# Altium PCB PCB.PcbDoc
Units mm, origin at the board's own origin, x right, y up, seen from the top; angles counter-clockwise.
Board outline 46.43 x 35.58 mm, 2 copper layers (Top Layer, Bottom Layer); 39 components, 27 nets, 193 pads, 33 vias.
Unrouted connection lines stored in the file: 76.
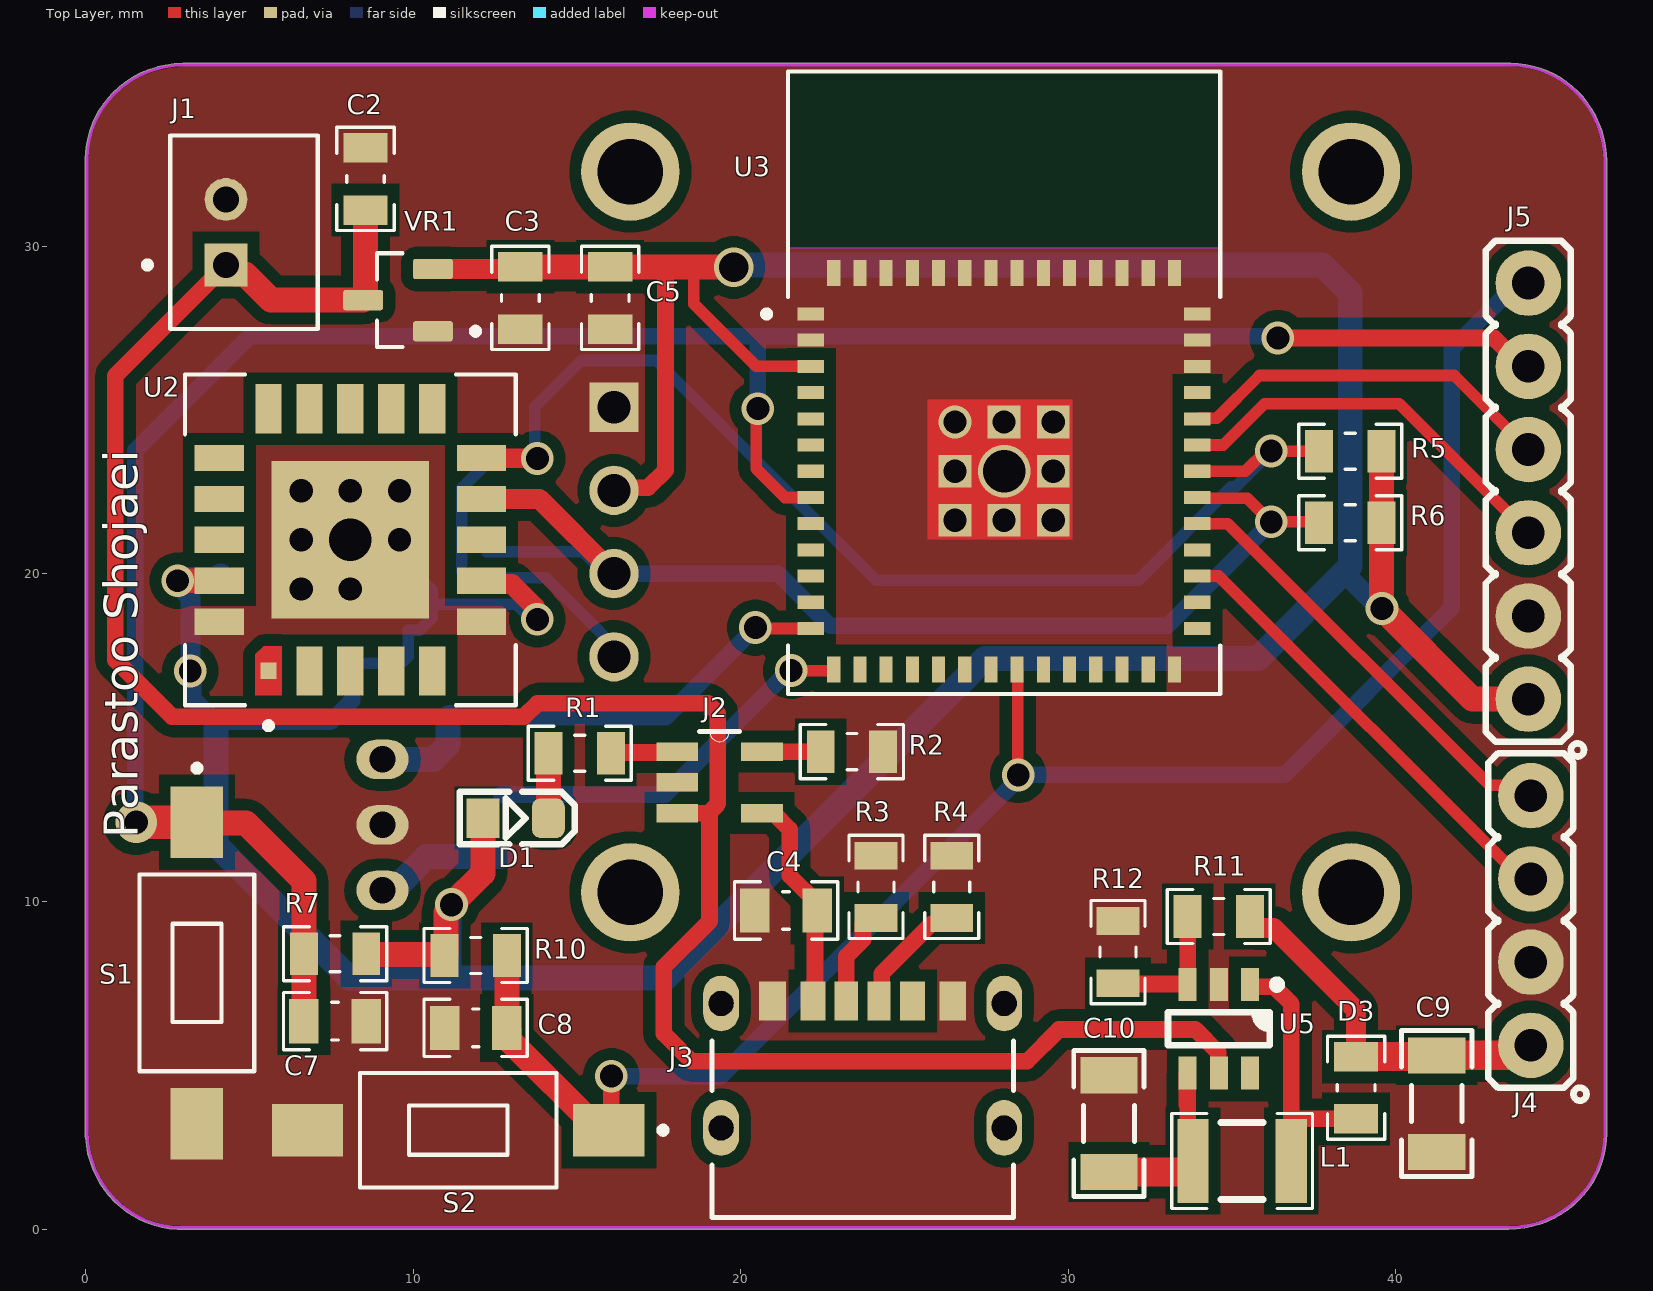
[diagram p0: Top Layer view]
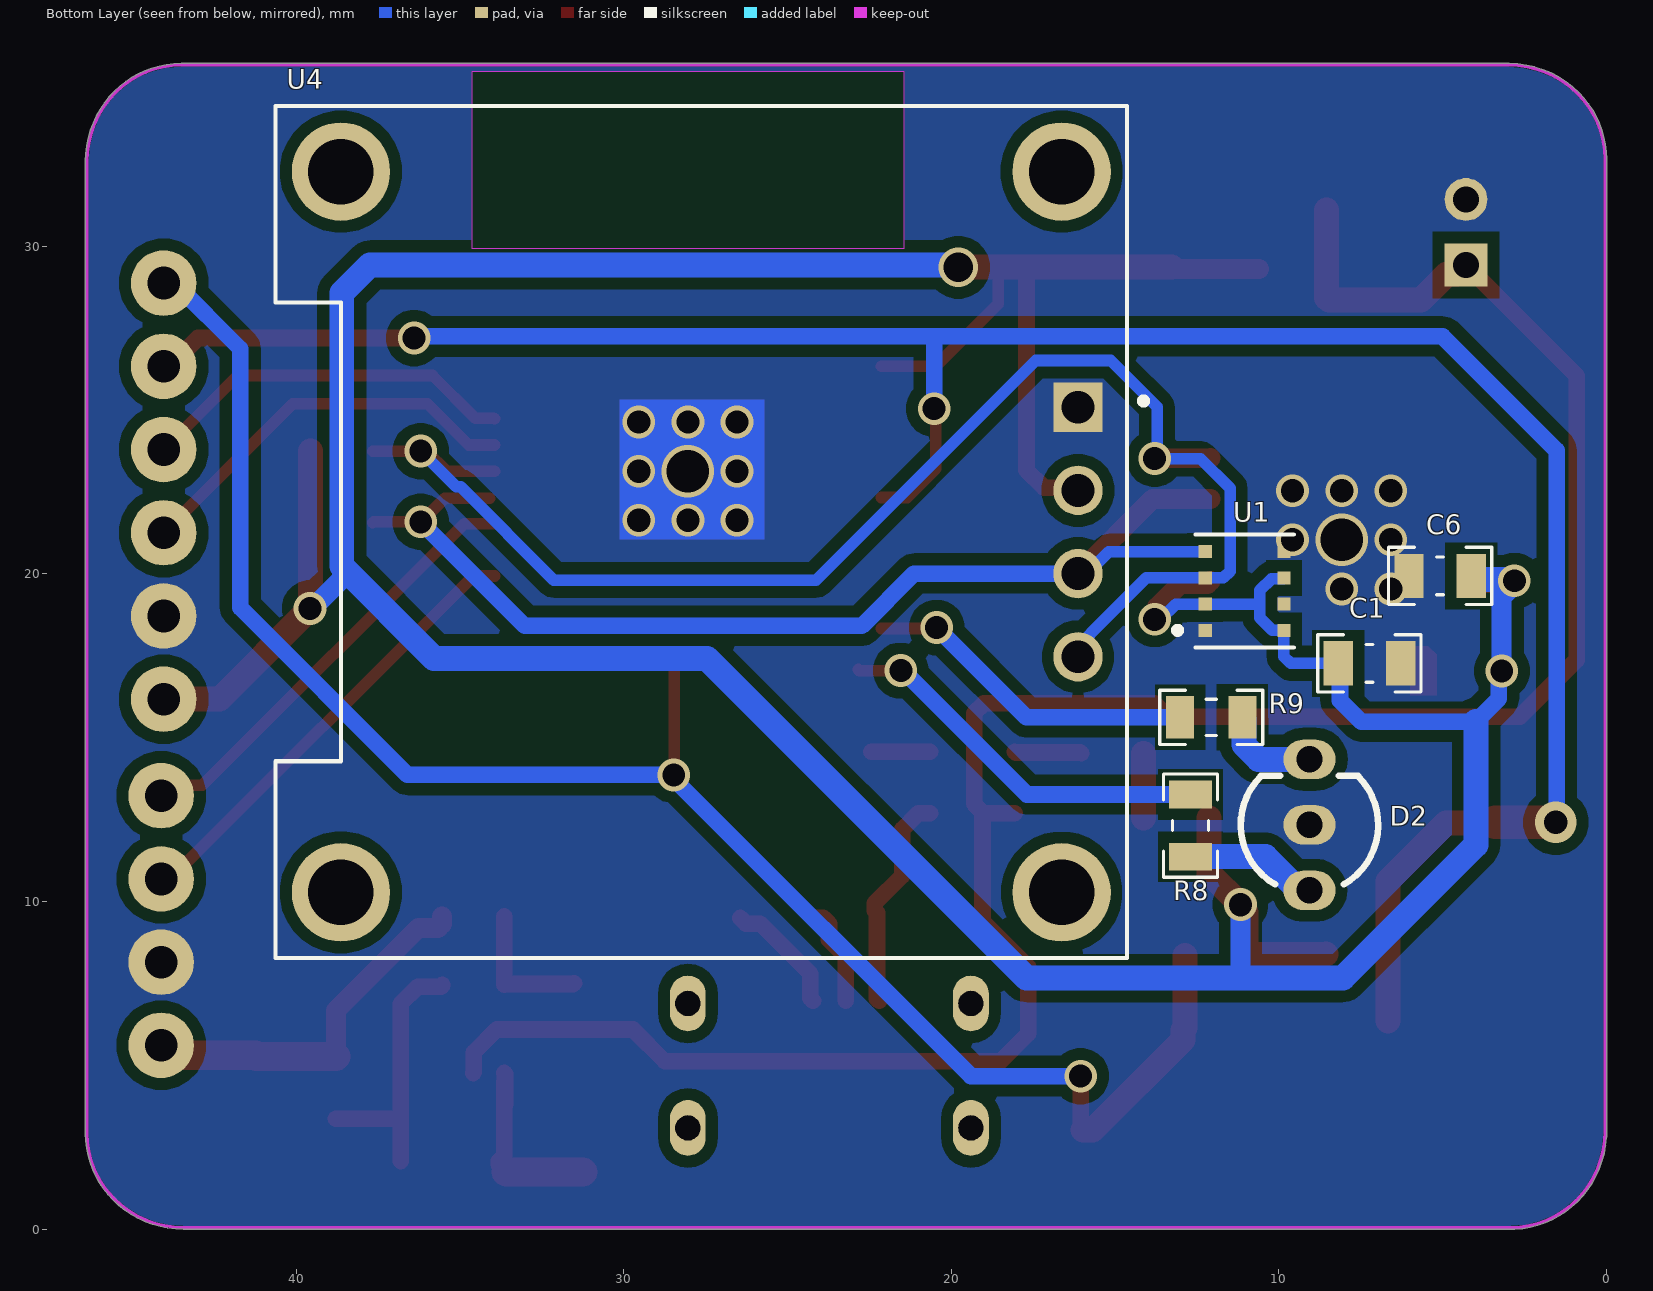
[diagram p1: Bottom Layer view, seen from below]

## Layer stack, top to bottom
Top Solder: solder mask 0.0102, Solder Resist, Dk 3.5
Top Layer: signal copper 0.0356
Dielectric 1: dielectric 0.32, FR-4, Dk 4.8
Bottom Layer: signal copper 0.0356
Bottom Solder: solder mask 0.0102, Solder Resist, Dk 3.5

## Board outline
0.89,0.839 cw(c3.04,2.988) 0.006,2.792 0,2.817 0,32.611 0,32.662 cw(c2.871,32.662) 0.841,34.692 cw(c2.99,32.542) 2.969,35.582 2.971,35.582 43.51,35.582 cw(c43.51,32.711) 45.54,34.741 cw(c43.39,32.592) 46.43,32.592 46.43,32.535 46.43,2.919 46.43,2.918 cw(c43.559,2.918) 45.589,0.888 cw(c43.44,3.038) 43.44,-0.002 2.819,-0.002 2.804,0 cw(c2.921,2.869)

## Design rules (kind name [scope] priority, off if disabled: settings)
Clearance "Keep Out layer" [All vs OnLayer('Keep-Out Layer')] p1: gap=0 ignorepadtopadclearanceinfootprint=FALSE
Clearance GND [All vs InNet('GND')] p2: gap=0.356 ignorepadtopadclearanceinfootprint=FALSE
Clearance [All] p3: gap=0.254 ignorepadtopadclearanceinfootprint=FALSE except(0.025: Arc-Text Track-Text SMDPad-Text THPad-Text Via-Text Fill-Text Poly-Text Region-Text Text-Text Text-Hole)
HoleSize [All] p1: absolutevalues=TRUE maxlimit=10 minlimit=0.051 maxpercent=80.000 minpercent=20.000
HoleToHoleClearance [All] p1: gap=0.102 allowstackedmicrovias=TRUE
MinimumSolderMaskSliver [All] p1: minsoldermaskwidth=0.076
PolygonConnect [All] p1: connectstyle=Direct reliefconductorwidth=0.254 reliefentries=4 polygonreliefangle="90 Angle" airgapwidth=0.254
RoutingVias [All] p1: holewidth=0.7 width=1 viastyle="Through Hole" minholewidth=0.7 minwidth=1 maxholewidth=3 maxwidth=3
SilkToSilkClearance [All] p1: silktosilkclearance=0.025
SilkToSolderMaskClearance [IsPad] p1: minsilkscreentomaskgap=0.025 clearancetoexposedcopper=TRUE
SolderMaskExpansion [All] p1: expansion=0.102 istentingtop=FALSE
Width [All] p1: maxlimit=3.81 minlimit=0.254 preferedwidth=0.356
25 further rules are at their usual default settings.

## Components (designator, comment, footprint, x,y, rotation, side; value= is the part's Value field where it differs from the comment)
C1 "100nf" CAP0805 7.239,17.272 r180 bottom
C2 "10uf" CAP0805 8.548,32.056 r270 top
C3 "10uf" CAP0805 13.273,28.424 r90 top
C4 "4.7uf" CAP0805 21.386,9.725 r180 top
C5 "4.7uf" CAP0805 16.016,28.424 r270 top
C6 "100nf" CAP0805 5.08,19.939 r0 bottom
C7 "100nf" CAP0805 7.62,6.347 r0 top
C8 "100nf" CAP0805 11.912,6.144 r180 top
C9 "22uf" CAP1206 41.249,3.833 r270 top
C10 "10uf" CAP1206 31.242,3.223 r90 top
D1 "LED805GRN" LED0805GRN 13.131,12.545 r0 top
D2 "LED" LED3BI 9.067,12.342 r90 bottom
D3 "SS14" CAP0805 38.785,4.315 r90 top
J1 "B2B-PH-K-S" JST_B2B-PH-K-S 4.84,30.431 r270 top
J2 "MCP73831T-2ACI/OT (Microchip)" SOT95P280X145-5N 19.354,13.637 r0 top
J3 "USB-C (2171750001)" 2171750001_MOL 23.723,3.934 r0 top
J4 "HDR1X4" HDR_M_1X4 44.119,9.421 r90 top value=HDRM4
J5 "HDR1X6" HDR_M_1X6 44.043,22.527 r90 top value=HDRM6
L1 "4.7uH" RES1210 35.306,2.08 r0 top
R1 "1k" RES0805 15.087,14.526 r0 top
R2 "10k" RES0805 23.393,14.577 r0 top
R3 "5.1k" RES0805 24.13,10.447 r90 top
R4 "5.1k" RES0805 26.441,10.447 r90 top
R5 "2k" RES0805 38.608,23.746 r180 top
R6 "2k" RES0805 38.608,21.562 r180 top
R7 "10k" RES0805 7.62,8.405 r180 top
R8 "220R" RES0805 12.7,12.319 r90 bottom
R9 "220R" RES0805 12.065,15.621 r180 bottom
R10 "2k" RES0805 11.912,8.354 r0 top
R11 "75K" RES0805 34.594,9.544 r0 top
R12 "10K" RES0805 31.517,8.455 r270 top
S1 "Push Button" SW_1437566-4 3.403,7.82 r270 top
S2 "Push Button" SW_1437566-4 11.379,3.02 r180 top
U1 "BME688" IC_BME688 11.049,19.479 r0 bottom
U2 "SCD40-D-R2" XDCR_SCD40-D-R2 8.086,21.042 r90 top
U3 "ESP32-MINI-1-N4" XCVR_ESP32-MINI-1-N4 28.04,23.135 r0 top locked
U4 "DM-OLED096-636" MODULE_DM-OLED096-636 27.633,21.281 r270 bottom locked
U5 "MT3608" "TI SOT-23-6 DBV" 34.594,6.115 r270 top
VR1 "MCP1700T-3302E_TT" SOT95P237X112-3N 9.541,28.358 r180 top

## Footprints (in the part's own frame and the unit in brackets; to place one, negate y for a bottom-side part, rotate by r counter-clockwise, add the part's x,y. Pads: shape width x height; smd on the part's side, far side on the other; paste and mask are expansions set on the pad)
2171750001_MOL [mil]
  oval 43x67 hole 30: 7(-170.08,116.32) 8(170.08,116.32) 9(-170.08,-33.29) 10(170.08,-33.29)
  rect 28x47 smd: A5(-19.68,119.46) B5(19.68,119.46)
  rect 30x47 smd: A9(59.84,119.46) B9(-59.84,119.46)
  rect 32x47 smd: A12(108.27,119.46) B12(-108.27,119.46)
  silkscreen extent -181,-141 181,71
CAP0805 [mm] "Chip Capacitor, 2-Leads, Body 2/00x1/25mm, IPC Medium Density DESIGNER:ABBAS BASEREH"
  rect 0.9x1.35 smd: 1(-0.95,0) 2(0.95,0)
  silkscreen extent -1.58,-0.87 1.58,0.87, body extent -1.02,-0.65 1.02,0.65, height 0.5
CAP1206 [mm] "Chip Capacitor, 2-Leads, Body 3/20x1/60mm, IPC Medium Density DESIGNER:ABBAS BASEREH"
  rect 1.1x1.75 smd: 1(-1.475,0) 2(1.475,0)
  silkscreen extent -2.22,-1.07 2.22,1.07, body extent -1.65,-0.85 1.65,0.85, height 0.94
HDR_M_1X4 [mm] "Connector; Header; 4 Position"
  round 2 hole 1 mask+0.1: 1(-3.81,0) 2(-1.27,0) 3(1.27,0) 4(3.81,0)
  silkscreen extent -5.5,-1.7 5.11,1.3, body extent -5.08,-1.27 5.08,1.27, height 8.54
HDR_M_1X6 [mm] "Connector; Header; 6 Position"
  round 2 hole 1 mask+0.1: 1(-6.35,0) 2(-3.81,0) 3(-1.27,0) 4(1.27,0) 5(3.81,0) 6(6.35,0)
  silkscreen extent -8.1,-1.7 7.65,1.3, body extent -7.62,-1.3 7.62,1.19, height 8.54
IC_BME688 [mm]
  rect 0.4x0.4 smd: 1(1.2,1.2) 2(1.2,0.4) 3(1.2,-0.4) 4(1.2,-1.2) 5(-1.2,-1.2) 6(-1.2,-0.4) 7(-1.2,0.4) 8(-1.2,1.2)
  silkscreen extent -1.5,-1.72 2.14,1.72
JST_B2B-PH-K-S [mm]
  rect 1.308x1.308 / inner round 1.308 / far side rect 1.308x1.308 hole 0.8: 1(1,-0.55)
  round 1.308 hole 0.8: 2(-1,-0.55)
  silkscreen extent -2.95,-3.05 2.95,2.25, body extent -2.95,-2.25 2.95,2.25, height 6
LED3BI [mm] "LED THD 5MM BICOLOR"
  oval 1.2x1.6 hole 0.8: 1(-2,0) 2(0,0) 3(2,0)
  silkscreen extent -1.82,-2.1 1.5,2.1, body extent -2.35,-1.99 2.35,1.99, height 7.4
LED0805GRN [mm] "LED SMD 0805, GREEN"
  rect 1x1.2 smd paste-2 mask+0.075: 1(-1,0)
  rrect50% 1x1.2 smd paste-2 mask+0.075: 2(1,0)
  Top Layer pour cut-out: -0.5,0.8 0.5,0.8 0.5,-0.8 -0.5,-0.8
  silkscreen extent -1.7,-0.8 1.8,0.8, body extent -1,-0.63 1,0.63, height 0.7
MODULE_DM-OLED096-636 [mm]
  rect 1.508x1.508 / inner round 1.508 / far side rect 1.508x1.508 hole 1: 1(-3.81,11.5)
  round 1.508 hole 1: 2(-1.27,11.5) 3(1.27,11.5) 4(3.81,11.5)
  round 3 hole 2: S1(-11,11) S2(11,11) S3(11,-11) S4(-11,-11)
  silkscreen extent -13,-13 13,13.6, body extent -13,-13 13,13, height 5.66
RES0805 [mm] "Chip Resistor, 2-Leads, Body 2/00x1/25mm, IPC Medium Density DESIGNER:ABBAS BASEREH"
  rect 0.85x1.3 smd: 1(-0.95,0) 2(0.95,0)
  silkscreen extent -1.58,-0.82 1.58,0.82, body extent -1.02,-0.65 1.02,0.65, height 0.5
RES1210 [mm] "Chip Resistor, 2-Leads, Body 3/20x2/50mm, IPC Medium Density DESIGNER:ABBAS BASEREH"
  rect 0.95x2.55 smd: 1(-1.5,0) 2(1.5,0)
  silkscreen extent -2.15,-1.45 2.15,1.45, body extent -1.63,-1.28 1.63,1.28, height 0.55
SOT95P237X112-3N [mm]
  rrect25% 1.22x0.62 smd: 1(-1.065,0.95) 2(-1.065,-0.95) 3(1.065,0)
  silkscreen extent -2.46,-1.43 0.64,1.43, body extent -1.18,-1.45 1.18,1.45, height 1.12
SOT95P280X145-5N [mil]
  rect 50x22 smd: 1(-51,37) 2(-51,0) 3(-51,-37) 4(51,-37) 5(51,37)
  silkscreen extent -24,49 24,61, body extent -53,-57 53,57, height 57
SW_1437566-4 [mm]
  rect 2.18x1.6 smd paste+0 mask+0.102: 1(-4.6,0) 2(4.6,0)
  silkscreen extent -6.35,-1.75 3,1.75
"TI SOT-23-6 DBV" [mm] "SOT23, 6-Leads, Body 2.90x2.80mm, Pitch 0.95mm, IPC Medium Density"
  rect 1x0.55 smd: 1(-1.35,0.95) 2(-1.35,0) 3(-1.35,-0.95) 4(1.35,-0.95) 5(1.35,0) 6(1.35,0.95)
  silkscreen extent -1.47,-1.55 0.5,1.9, body extent -1.44,-1.53 1.44,1.52, height 1.45
XCVR_ESP32-MINI-1-N4 [mm]
  rect 0.8x0.4 smd: 1(-5.9,4.8) 2(-5.9,4) 3(-5.9,3.2) 4(-5.9,2.4) 5(-5.9,1.6) 6(-5.9,0.8) 7(-5.9,0) 8(-5.9,-0.8) 9(-5.9,-1.6) 10(-5.9,-2.4) 11(-5.9,-3.2) 12(-5.9,-4) 13(-5.9,-4.8) 28(5.9,-4.8) 29(5.9,-4) 30(5.9,-3.2) 31(5.9,-2.4) 32(5.9,-1.6) 33(5.9,-0.8) 34(5.9,0) 35(5.9,0.8) 36(5.9,1.6) 37(5.9,2.4) 38(5.9,3.2) 39(5.9,4) 40(5.9,4.8)
  rect 0.4x0.8 smd: 14(-5.2,-6.05) 15(-4.4,-6.05) 16(-3.6,-6.05) 17(-2.8,-6.05) 18(-2,-6.05) 19(-1.2,-6.05) 20(-0.4,-6.05) 21(0.4,-6.05) 22(1.2,-6.05) 23(2,-6.05) 24(2.8,-6.05) 25(3.6,-6.05) 26(4.4,-6.05) 27(5.2,-6.05) 41(5.2,6.05) 42(4.4,6.05) 43(3.6,6.05) 44(2.8,6.05) 45(2,6.05) 46(1.2,6.05) 47(0.4,6.05) 48(-0.4,6.05) 49(-1.2,6.05) 50(-2,6.05) 51(-2.8,6.05) 52(-3.6,6.05) 53(-4.4,6.05) 54(-5.2,6.05)
  rect 0.25x0.25 smd paste-1 mask+0: 55_1(-1.5,1.5)
  rect 1x1 smd: 55_2(0,1.5) 55_3(1.5,1.5) 55_4(-1.5,0) 55_5(0,0) 55_6(1.5,0) 55_7(-1.5,-1.5) 55_8(0,-1.5) 55_9(1.5,-1.5)
  Top Layer region: -1,1 -2,1 -2,1.4 -1.4,2 -1,2
  Keep-Out Layer region: 6.6,6.8 -6.6,6.8 -6.6,12.2 6.6,12.2
  silkscreen extent -7.35,-6.8 6.6,12.2, body extent -6.6,-9.5 6.6,9.5, height 2.55
XDCR_SCD40-D-R2 [mm]
  rect 0.5x0.5 smd paste-1 mask+0: 1(-4,2.5)
  rect 1.5x0.8 smd paste-0.125 mask+0.1: 2(-4,1.25) 3(-4,0) 4(-4,-1.25) 5(-4,-2.5) 11(4,-2.5) 12(4,-1.25) 13(4,0) 14(4,1.25) 15(4,2.5)
  rect 0.8x1.5 smd paste-0.125 mask+0.1: 6(-2.5,-4) 7(-1.25,-4) 8(0,-4) 9(1.25,-4) 10(2.5,-4) 16(2.5,4) 17(1.25,4) 18(0,4) 19(-1.25,4) 20(-2.5,4)
  rect 4.8x4.8 smd paste-3 mask+0.1: 21(0,0)
  Top Layer region: -3.25,2.65 -3.25,2.1 -4.75,2.1 -4.75,2.9 -3.5,2.9
  silkscreen extent -5.77,-5.05 5.05,5.05, body extent -5.05,-5.05 5.05,5.05, height 5.48

## Part data
C1 C2 C3 C4 C5 C6 C7 C8: library part "Capacitor SMD", Manufacture=www.novaday.ir, Purchase Link1=https://www.javanelec.com/Shops/ProductDetail/4196?part_number=1UF%20%280805%29%2050V%2010%25%20X7R, Purchase Link2=https://kaelectronic.ir/index.php?route=product/product&product_id=5502&search=1UF, Seller="javan electronic"
C9 C10: library part "Capacitor Ceramic", Manufacture=www.novaday.ir, Purchase Link1=https://www.javanelec.com/Shops?productCategory=1128#dtl/5328, Seller="javan electronic"
D1: library part LED_SMD_0805_GRN, "LED, SMD, 0805, GREEN", Manufacture=www.novaday.ir, Purchase Link1=https://www.javanelec.com/Shops/ProductDetail/11924?part_number=LED%20%280805%29%20G, Seller="javan electronic"
D2: library part LED_THD_BICOLOR_RG_CC3, "LED, THD, 3MM, BICOLOR CC GRNRED", ASSEMBLY=ASSEMBLY, DESC=DESCRIPTION, MANF=kingbright, MANF_P#=WP3VSURKCGKW, PRICE=PRICE
D3: library part DIODE_SMD_SCHOTTKY_SS34, Manufacture=www.novaday.ir, Purchase Link1=https://www.javanelec.com/Shops?searchFilter=5822#dtl/626, Seller="javan electronic"
J1: "Connector Header Through Hole 2 position 0.079 (2.00mm)", Package=None, Check_prices=https://www.snapeda.com/parts/B2B-PH-K-S/JST/view-part/?ref=eda, MF="JST Sales America Inc.", MP=B2B-PH-K-S, SnapEDA_Link=https://www.snapeda.com/parts/B2B-PH-K-S/JST/view-part/?ref=snap
J2: library part MCP73831T-2ACI/OT, "Charger IC Lithium Ion/Polymer SOT-23-5", Package="SOT-23 Microchip", Availability="In Stock", Check_prices=https://www.snapeda.com/parts/MCP73831T-2ACI/OT/Microchip/view-part/?ref=eda, MF=Microchip, MP=MCP73831T-2ACI/OT, PRICE=None, Purchase-URL=https://pricing.snapeda.com/search/part/MCP73831T-2ACI/OT/?ref=eda, SnapEDA_Link=https://www.snapeda.com/parts/MCP73831T-2ACI/OT/Microchip/view-part/?ref=snap
J3: library part 2171750001, "USB-C (USB TYPE-C) USB 2.0 Receptacle Connector 24 (6+18 Dummy) Position Surface Mount, Right Angle; Through HoleÄáº§u ná»‘i á»• cáº¯m USB 2.0 USB-C (USB TYPE-C) 24 (6 + 18 giáº£) Vá»‹ trÃ­ GiÃ¡ treo bá» máº·t, gÃ³c pháº£i; ThÃ´ng qua lá»—", Package=None, Check_prices=https://www.snapeda.com/parts/2171750001/Molex/view-part/?ref=eda, MF=Molex, MP=2171750001, SnapEDA_Link=https://www.snapeda.com/parts/2171750001/Molex/view-part/?ref=snap
J4: library part HDR_M_1X4, "CONN, HEADER, Male, pitch: 2.54mm, 4POS"
J5: library part HDR_M_1X6, "CONN, HEADER, Male, pitch: 2.54mm, 6POS"
L1: library part IND-NR6045-22UH, Purchase Link1=https://www.javanelec.com/Shops?searchFilter=6045#dtl/12927, Seller="javan electronic"
R1 R2 R3 R4 R5 R6 R7 R8 R9 R10 R12: library part Resistor, Manufacture=www.novaday.ir, Seller="javan electronic"
  R1 R2 R3 R4 R5 R6 R7 R8 R9 R10: Purchase Link1=https://www.javanelec.com/Shops?productCategory=866#dtl/4027
  R12: Purchase Link1=https://www.javanelec.com/Shops?productCategory=866#dtl/17311
R11: library part Resistor, "\"\"Both links should be purchased.\"\"", Manufacture=www.novaday.ir, Purchase Link1=https://www.javanelec.com/Shops?productCategory=866#dtl/3977, Seller="javan electronic"
S1 S2: library part 1437566-4, "FSMSMTR=TACT SWITCH SPST-NO", Contact_Current_Rating="50 mA", Package=None, Check_prices=https://www.snapeda.com/parts/1437566-4/TE+Connectivity+Alcoswitch+Switches/view-part/?ref=eda, Configuration_Pole-Throw="Single Pole - Single Throw", MF="TE Connectivity", MP=1437566-4, SnapEDA_Link=https://www.snapeda.com/parts/1437566-4/TE+Connectivity+Alcoswitch+Switches/view-part/?ref=snap
U1: "Gas sensor measuring relative humidity, barometric pressure, ambient temperature and gas (VOC)", Package=None, Availability=Unavailable, MP=BME688, PRICE=None
U2: "Air Quality Sensor CO2 Sensor 2.5V/3.3V/5V 20-Pin SMD EP", Package=None, Check_prices=https://www.snapeda.com/parts/SCD40-D-R2/Sensirion+AG/view-part/?ref=eda, MF="Sensirion AG", MP=SCD40-D-R2, SnapEDA_Link=https://www.snapeda.com/parts/SCD40-D-R2/Sensirion+AG/view-part/?ref=snap
U3: "Bluetooth, WiFi 802.11b/g/n, Bluetooth v4.2 +EDR, Class 1, 2 and 3 Transceiver Module 2.412GHz ~ 2.484GHz Integrated, Trace Chassis Mount", Package="Module Espressif Systems", Check_prices=https://www.snapeda.com/parts/ESP32-MINI-1-N4/Espressif+Systems/view-part/?ref=eda, MF="Espressif Systems", MP=ESP32-MINI-1-N4, SnapEDA_Link=https://www.snapeda.com/parts/ESP32-MINI-1-N4/Espressif+Systems/view-part/?ref=snap
U4: "0.96â€ 128 X 64 MONOCHROME GRAPHIC OLED DISPLAY MODULE - I2C", Package=Package, Check_prices=https://www.snapeda.com/parts/DM-OLED096-636/Display+Module/view-part/?ref=eda, MF="Display Module", MP=DM-OLED096-636, SnapEDA_Link=https://www.snapeda.com/parts/DM-OLED096-636/Display+Module/view-part/?ref=snap
VR1: "Pwr Sply Func,Voltage Regulator,LDO,SOT-23,PD 369.6mW,VO 3.3V,Regline +/-0.75%/V", Package="SOT-23 Microchip", Check_prices=https://www.snapeda.com/parts/MCP1700T-3302E/TT/Microchip/view-part/?ref=eda, MF=Microchip, MP=MCP1700T-3302E/TT, SnapEDA_Link=https://www.snapeda.com/parts/MCP1700T-3302E/TT/Microchip/view-part/?ref=snap
U5: Manufacture=www.novaday.ir, Purchase Link1=https://digighate.com/product/MT3608, Seller="Shopping is offline"

## Via types
v1: diameter 1, hole 0.711, Top Layer to Bottom Layer, tented both sides, 16 vias
v2: diameter 1, hole 0.7, Top Layer to Bottom Layer, tented both sides, 13 vias
v3: diameter 1.6, hole 1.3, Top Layer to Bottom Layer, tented both sides, 2 vias
v4: diameter 1.27, hole 0.711, Top Layer to Bottom Layer, tented both sides, 1 vias
v5: diameter 1.2, hole 0.9, Top Layer to Bottom Layer, tented both sides, 1 vias

## Nets (pads, with @x,y where several pads share a name; then routed paths per layer and width w, separated by ;. In a path a pad name is that pad's centre, name@x,y a point inside that pad or via, vN(x,y) a via of type N, cw(c..) or ccw(c..) an arc to the next point about the centre after c; other vN are vias at no path point)
5V_BOOST: C9.1 D3.2 J4.1 R11.2 | length 11.4
  Top Layer w0.61: R11.2 35.544,9.319 35.665,9.199 36.267,9.199 38.785,6.681 D3.2 ; J4.1@43.44,5.308 43.743,5.611 J4.1
  Top Layer w0.889: D3.2 C9.1@41.207,5.265 ; C9.1 J4.1@43.44,5.308
+3.3V: C1.1 C3.2 C5.1 C6.1 D1.1 J5.1 R5.1 R6.1 R7.1 R10.1 U1.2 U1.6 U1.8 U2.7 U2.19 U3.3 U4.2 VR1.2 | length 140.5
  Top Layer w0.356: 18.567,29.374 18.567,28.242 20.474,26.335 U3.3
  Top Layer w0.508: U4.2 16.217,22.635 17.176,22.635 17.703,23.162 17.703,29.374
  Top Layer w0.61: VR1.2 10.611,29.313 13.212,29.313 C3.2 ; U2.7 12.181,19.696 13.015,19.696 13.717,18.994 13.717,18.69 v2(13.792,18.615)
  Top Layer w0.762: v2(2.814,19.792) U2.19 ; R7.1 8.595,8.379 10.937,8.379 R10.1 11.006,8.398 11.006,9.672 11.176,9.842 v1(11.176,9.906) 12.131,10.861 D1.1 ; C3.2 C5.1 17.703,29.374 18.567,29.374 19.772,29.374 v5(19.786,29.36) ; R5.1 R6.1 39.558,18.961 42.341,16.177 J5.1
  Bottom Layer w0.356: C1.1 9.64,17.272 9.849,17.48 U1.8 10.203,18.279 10.582,18.658 10.582,19.5 10.225,19.857 9.871,19.857 U1.6 ; 10.582,19.079 U1.2 13.154,19.079 13.617,18.615 v2(13.792,18.615)
  Bottom Layer w0.508: v2(3.199,17.04) 3.294,16.946 3.294,16.185 3.987,15.491 7.49,15.491 8.137,16.138 8.137,17.22 C1.1
  Bottom Layer w0.61: v2(2.814,19.792) 2.814,19.686 3.199,19.301 v2(3.199,17.04) ; 11.176,7.668 v1(11.176,9.906) ; 38.67,19.784 v2@39.508,18.946
  Bottom Layer w0.762: v2(2.814,19.792) 2.86,19.837 4.061,19.837 4.13,19.906 C6.1 ; 3.987,15.491 3.987,11.732 8.051,7.668 11.176,7.668 17.701,7.668 27.455,17.422 35.788,17.422 38.608,20.241 38.608,28.572 37.744,29.436 19.862,29.436 v5(19.786,29.36) ; v2@39.508,18.946 v2(39.573,18.946)
BOOT: C8.1 J5.6 R10.2 S2.1 U3.21 | length 54.4
  Top Layer w0.356: U3.21 28.456,17.069 28.456,13.882 v2(28.473,13.866)
  Top Layer w0.508: S2.1 16.052,3.093 v2(16.052,4.671)
  Top Layer w0.762: R10.2 C8.1 12.931,6.075 12.931,5.777 15.689,3.02 S2.1
  Bottom Layer w0.508: v2(16.052,4.671) 19.405,4.671 28.473,13.739 v2(28.473,13.866) 36.599,13.866 41.706,18.973 41.706,26.873 43.711,28.877 J5.6
EN: C7.1 J5.5 R7.2 S1.1 U3.8 | length 72.2
  Top Layer w0.356: v2(20.523,25.044) 20.472,24.993 20.472,23.21 21.347,22.335 U3.8
  Top Layer w0.508: S1.1@3.401,12.418 S1.1 ; v2(36.398,27.201) 43,27.201 43.863,26.337 J5.5
  Top Layer w0.762: S1.1 3.429,12.394 4.9,12.394 6.67,10.625 R7.2 6.67,6.525 C7.1
  Top Layer w1.016: v4(1.549,12.418) S1.1@3.401,12.418
  Bottom Layer w0.508: v4(1.549,12.418) 1.524,12.443 1.524,23.772 5.003,27.251 20.523,27.251 ; v2(20.523,25.044) 20.523,27.251 ; v2(36.398,27.201) 36.347,27.251 20.523,27.251 ; J5.5@43.84,26.54 J5.5
GND: C1.2 C2.1 C3.1 C4.2 C5.2 C6.2 C7.2 C8.2 C9.2 C10.2 D2.2 J1.2 J2.2 J3.A12 J3.B12 J4.2 J5.2 R2.2 R3.2 R4.2 R12.1 S1.2 S2.2 U1.1 U1.5 U1.7 U2.6 U2.20 U2.21 U3.1 U3.2 U3.27 U3.38 U3.39 U3.40 U3.41 U3.42 U3.43 U3.44 U3.45 U3.46 U3.47 U3.48 U3.49 U3.50 U3.51 U3.52 U3.53 U3.54 U3.55_1 U3.55_2 U3.55_3 U3.55_4 U3.55_5 U3.55_6 U3.55_7 U3.55_8 U3.55_9 U4.1 U5.2 VR1.1 | length 0.7
  Bottom Layer w0.356: C6.2 6.427,19.542 v1(6.586,19.542)
  other v1: 8.086,19.542 6.586,21.042 9.586,21.042 26.54,21.635 28.04,21.635 29.54,21.635 6.586,22.542 8.086,22.542 9.586,22.542 26.54,23.135 29.54,23.135 26.54,24.635 28.04,24.635 29.54,24.635
  other v3: 8.086,21.042 28.04,23.135
LED_B: U3.15
LED_G: R8.2 U3.14 | length 11.7
  Top Layer w0.356: v2(21.542,17.05) 22.818,17.05 22.84,17.072 U3.14
  Bottom Layer w0.508: R8.2 17.691,13.269 21.472,17.05 v2(21.542,17.05)
LED_R: R9.1 U3.13 | length 10.3
  Top Layer w0.356: v2(20.447,18.361) 20.473,18.335 U3.13
  Bottom Layer w0.508: R9.1 17.706,15.621 v2(20.447,18.361)
NetD1_2: D1.2 R1.1 | length 2
  Top Layer w0.508: R1.1@14.134,14.523 R1.1
  Top Layer w0.762: D1.2 R1.1@14.131,14.52
NetD2_1: D2.1 R8.1 | length 4.1
  Bottom Layer w0.762: D2.1 9.386,10.342 10.413,11.369 R8.1
NetD2_3: D2.3 R9.2 | length 3
  Bottom Layer w0.762: D2.3 10.625,14.342 11.071,14.788 11.071,15.577 R9.2
NetD3_1: D3.1 L1.2 U5.1 | length 8.3
  Top Layer w0.508: U5.1 35.544,7.425 35.565,7.404 36.284,7.404 36.806,6.882 36.806,3.365 ; L1.2 36.806,3.365 ; D3.1 36.806,3.365
NetJ2_1: J2.1 R1.2 | length 2
  Top Layer w0.508: R1.2 16.063,14.551 18.034,14.551 J2.1
NetJ2_5: J2.5 R2.1 | length 1.8
  Top Layer w0.508: J2.5 R2.1
NetJ3_A5: J3.A5 R3.1 | length 3
  Top Layer w0.508: J3.A5 23.223,8.328 23.734,8.838 23.734,9.326 23.905,9.497 R3.1
NetJ3_B5: J3.B5 R4.1 | length 3.7
  Top Layer w0.508: J3.B5 24.303,7.049 24.303,7.797 25.832,9.326 26.27,9.326 R4.1
NetR11_1: R11.1 R12.2 U5.3 | length 4.2
  Top Layer w0.508: R12.2 31.537,7.485 33.624,7.485 U5.3 R11.1
PM_RX: J4.3 U3.30 | length 14
  Top Layer w0.356: U3.30 34.595,19.935 43.84,10.691 J4.3
PM_TX: J4.4 U3.32 | length 13.6
  Top Layer w0.356: U3.32 34.873,21.535 42.863,13.545 43.805,13.545 J4.4
PROG_RX: J5.3 U3.35 | length 12.3
  Top Layer w0.356: U3.35 34.73,23.935 35.989,25.194 40.106,25.194 J5.3
PROG_TX: J5.4 U3.36 | length 11.6
  Top Layer w0.356: U3.36 33.962,24.757 34.536,24.757 35.837,26.058 41.783,26.058 J5.4
SCL: R6.2 U1.4 U2.9 U3.33 U4.3 | length 35.1
  Top Layer w0.356: U3.33@34.086,22.315 35.458,22.315 36.183,21.59 37.629,21.59 R6.2
  Top Layer w0.61: U2.9 13.852,22.292 U4.3
  Bottom Layer w0.254: U4.3@15.865,20.011 U4.3
  Bottom Layer w0.356: U1.4 15.196,20.679 U4.3@15.865,20.011
  Bottom Layer w0.508: U4.3 21.137,20.011 22.733,18.415 33.02,18.415 v2(36.195,21.59)
SDA: R5.2 U1.3 U2.10 U3.34 U4.4 | length 45.9
  Top Layer w0.356: U3.34 35.407,23.135 36.021,23.749 37.655,23.749 R5.2
  Top Layer w0.61: U2.10 12.096,23.531 13.782,23.531 v2(13.792,23.52)
  Bottom Layer w0.356: U4.4 16.133,17.782 15.744,18.172 15.744,18.191 14.055,19.879 U1.3 11.698,19.879 11.49,20.087 11.49,22.615 12.395,23.52 v2(13.792,23.52) 13.716,23.597 13.716,25.095 15.136,26.515 17.427,26.515 24.13,19.812 32.131,19.812 34.98,22.661 35.107,22.661 v2(36.195,23.749)
VBAT: C2.2 J1.1 J2.3 U5.5 VR1.3 | length 70.3
  Top Layer w0.508: J1.1 0.914,26.055 0.914,17.371 2.641,15.644 13.39,15.644 13.796,16.05 19.006,16.05 19.304,15.752 19.304,12.981 19.045,12.723 ; J2.3 19.047,12.697 19.047,9.395 17.653,8.001 17.653,5.969 18.497,5.125 28.747,5.125 29.715,6.093 33.881,6.093 34.573,5.401 34.573,4.786 U5.5
  Top Layer w0.762: J1.1 4.563,29.158 4.866,29.158 5.666,28.358 8.477,28.358 8.548,28.429 C2.2
VBAT_SENSE: U3.9
VBUS: C4.1 J2.4 J3.B9 | length 6.7
  Top Layer w0.508: J2.4 21.005,12.697 21.498,12.204 21.498,10.789 22.336,9.95 C4.1 22.27,9.659 22.27,7.035 J3.B9
VIN: C10.1 L1.1 U5.4 | length 6.2
  Top Layer w0.508: L1.1@33.585,1.748 33.806,1.969 L1.1 33.644,2.241 33.644,3.805 U5.4@33.644,4.51 ; 33.623,3.805 33.623,4.744 U5.4
  Top Layer w0.889: C10.1 L1.1@33.585,1.748
pads on no net: J3.7 J3.8 J3.9 J3.10 J3.A9 U2.1 U2.2 U2.3 U2.4 U2.5 U2.8 U2.11 U2.12 U2.13 U2.14 U2.15 U2.16 U2.17 U2.18 U3.4 U3.5 U3.6 U3.7 U3.10 U3.11 U3.12 U3.16 U3.17 U3.18 U3.19 U3.20 U3.22 U3.23 U3.24 U3.25 U3.26 U3.28 U3.29 U3.31 U3.37 U4.S1 U4.S2 U4.S3 U4.S4 U5.6

## Polygon pours and split planes (outlines as drawn)
GND on Bottom Layer "GND_L02_P000" (solid, remove dead copper, pour order 0): 46.482,35.582 46.482,0 0,0 0,35.582
GND on Top Layer "GND_L01_P001" (solid, remove dead copper, pour order 1): 46.482,35.582 46.482,0 0,0 0,35.582

## Keep-outs
Keep-Out Layer:
  lines w0.1: 0.05,2.817 0.05,32.611 ; 0.05,2.988 ccw(c3.04,2.988) 0.926,0.874 ccw(c2.921,2.869) 2.921,0.048 ; 0.05,32.662 cw(c2.871,32.662) 0.877,34.656 cw(c2.99,32.542) 2.99,35.532 ; 2.819,0.048 43.44,0.048 ccw(c43.44,3.038) 45.554,0.924 ccw(c43.559,2.918) 46.38,2.918 46.38,32.535 46.38,32.592 ccw(c43.39,32.592) 45.504,34.706 ccw(c43.51,32.711) 43.51,35.532 2.971,35.532

## Other copper
Top Layer:
  rectangle net GND: 25.704,21.054 30.124,25.321
Bottom Layer:
  rectangle net GND: 25.704,21.054 30.124,25.321

## Silkscreen, mask and mechanical layers (free items; w line width, h text height)
Top Overlay:
  text "Parastoo Shojaei" at 1.95,11.938 h1.78 r90

## Text inside footprints (layer, text, board x,y; h text height)
J3: Mechanical 13 "*" at 22.631,5.585 h1.27